# Altium PCB MainBoardPCB_4.PcbDoc (part 32 of 32)
Units mm, origin at the board's own origin, x right, y up, seen from the top; angles counter-clockwise.
Board outline 333.63 x 349.38 mm, 16 copper layers (L1, L2 (GND), L3 (Sign), L4 (GND), L5 (Sign), L6 (PWR/GND), L7(PWR/GND), L8 (Plane_GND), L9 (PWR/GND), L10 (PWR/GND), L11 (PWR/GND), L12 (Sign), L13 (GND), L14 (Sign), L15 (GND), L16), stack 2.502 mm thick; 2205 components, 1648 nets, 8314 pads, 3172 vias.
Unrouted connection lines stored in the file: 5141.
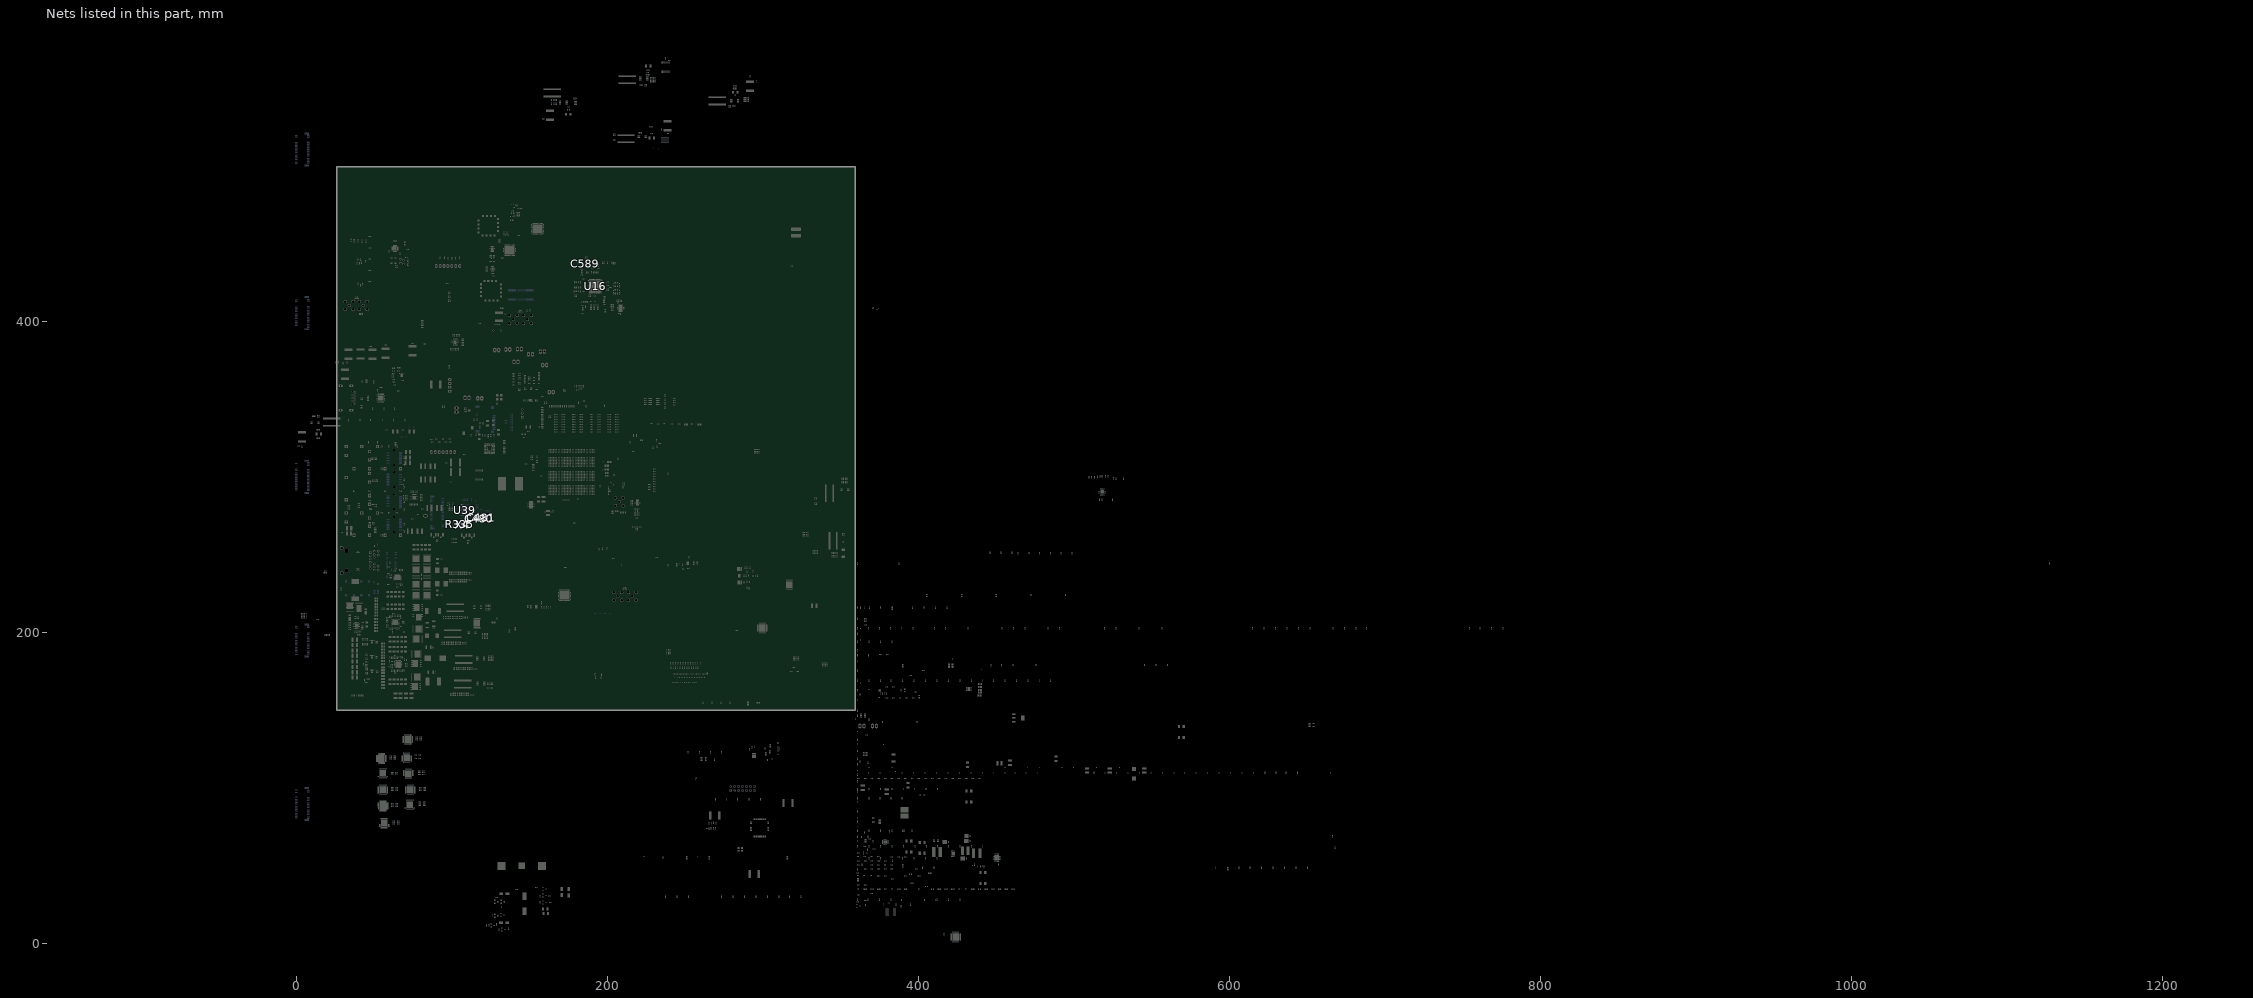
[diagram p32: the nets of this part, all layers, seen from the top]

## Via types
v1: diameter 0.5, hole 0.2, L1 to L16, tented both sides, 1153 vias
v2: diameter 0.5/0.35/0.35/0.35/0.35/0.35/0.35/0.35/0.35/0.35/0.35/0.35/0.35/0.35/0.35/0.5 (per signal layer), hole 0.2, L1 to L16, tented both sides, 548 vias
v3: diameter 0.5, hole 0.2, L1 to L16, 522 vias
v4: diameter 0.5/0.35/0.35/0.35/0.35/0.35/0.35/0.35/0.35/0.35/0.35/0.35/0.35/0.35/0.35/0.5 (per signal layer), hole 0.15, L1 to L16, tented both sides, 266 vias
v5: diameter 0.8, hole 0.4, L1 to L16, tented both sides, 164 vias
v6: diameter 0.35/0/0.35 (per signal layer), hole 0.127, L1 to L3 (Sign), tented both sides, 132 vias
v7: diameter 2.54, hole 1.02, L1 to L16, 125 vias
v8: diameter 1.4, hole 0.5, L1 to L16, tented both sides, 80 vias
v9: diameter 0.35, hole 0.127, L1 to L2 (GND), tented both sides, 36 vias
v10: diameter 0.4, hole 0.2, L1 to L16, 16 vias
v11: diameter 0.25, hole 0.2, L1 to L16, 16 vias
v12: diameter 5, hole 3, L1 to L16, 15 vias
v13: diameter 0.3, hole 0.2, L1 to L16, 15 vias
v14: diameter 0.45, hole 0.15, L1 to L16, 12 vias
v15: diameter 0.5/0.35/0.35/0.35/0.35/0.35/0.35/0.35/0.35/0.35/0.35/0.35/0.35/0.35/0.35/0.45 (per signal layer), hole 0.15, L1 to L16, tented both sides, 10 vias
v16: diameter 0.2/0/0.2 (per signal layer), hole 0.1, L1 to L3 (Sign), tented both sides, 9 vias
v17: diameter 0.4, hole 0.1, L1 to L16, 7 vias
v18: diameter 0.5, hole 0.2, L3 (Sign) to L6 (PWR/GND), tented both sides, 6 vias
v19: diameter 1.65, hole 1.65, L1 to L16, 6 vias
v20: diameter 1.15, hole 1.15, L1 to L16, 6 vias
v21: diameter 0.35/0/0.35 (per signal layer), hole 0.127, L14 (Sign) to L16, tented both sides, 5 vias
v22: diameter 0.2, hole 0.1, L1 to L16, 4 vias
v23: diameter 0.4, hole 0.2, L1 to L16, tented both sides, 2 vias
v24: diameter 0.4, hole 0.15, L1 to L16, 2 vias
v25: diameter 0.508, hole 0.127, L1 to L2 (GND), 2 vias
v26: diameter 0.508, hole 0.127, L2 (GND) to L3 (Sign), 2 vias
v27: diameter 0.5/0.35/0.35/0.35/0.35/0.35/0.35/0.35/0.35/0.35/0.35/0.35/0.35/0.35/0.35/0.5 (per signal layer), hole 0.15, L1 to L16, 2 vias
v28: diameter 0.35, hole 0.127, L3 (Sign) to L6 (PWR/GND), tented both sides, 2 vias
v29: diameter 5.5, hole 3.5, L1 to L16, 1 vias
v30: diameter 0.5/0.35/0.35/0.35/0.35/0.35/0.35/0.35/0.35/0.35/0.35/0.35/0.35/0.35/0.35/0.5 (per signal layer), hole 0.2, L1 to L16, 1 vias
v31: diameter 0.35/0.35/0.35 (per signal layer), hole 0.127, L1 to L3 (Sign), tented both sides, 1 vias
v32: diameter 0.45/0/0.45 (per signal layer), hole 0.15, L1 to L3 (Sign), tented both sides, 1 vias
v33: diameter 0.45/0/0.45 (per signal layer), hole 0.2, L14 (Sign) to L16, tented both sides, 1 vias
v34: diameter 0.35, hole 0.127, L2 (GND) to L3 (Sign), 1 vias
v35: diameter 0.35, hole 0.127, L1 to L2 (GND), 1 vias

## Nets (pads, with @x,y where several pads share a name; then routed paths per layer and width w, separated by ;. In a path a pad name is that pad's centre, name@x,y a point inside that pad or via, vN(x,y) a via of type N, cw(c..) or ccw(c..) an arc to the next point about the centre after c; other vN are vias at no path point) (continued)
X1: C481.2 R335.2 U39.14 X4.1
X2: C480.2 R335.1 U39.15 X4.3
XO_LMK05028_P: C589.2 U16.43
pads on no net: C558.4 D22.2 D28.1 J1_PCIE0. J1_PCIE0.56 J1_PCIE0.58 J1_PCIE1. J1_PCIE1.56 J1_PCIE1.58 J1_PCIE2. J1_PCIE2.56 J1_PCIE2.58 J1_PCIE3. J1_PCIE3.56 J1_PCIE3.58 J1_PCIE4. J1_PCIE4.56 J1_PCIE4.58 J14.3 J27. J27.5 J27.6 J27.7 J27.8 J27.11 J27.13 J27.17 J27.19 J27.20 J27.22 J27.23 J27.24 J27.25 J27.26 J27.28 J27.30 J27.32 J27.34 J27.36 J27.40 J27.42 J27.44 J27.46 J27.48 J27.56 J27.58 J27.59 J28.MH1 J28.MH2 J31. J31.1 J31.2 J31.3 J31.4 J31.5 J31.6 J31.7 J31.8 J31.9 J31.10 J31.11 J31.12 J31.13 J31.14 J31.15 J31.16 J31.17 J31.18 J31.19 J31.20 J31.21 J31.22 J31.23 J31.24 J31.25 J31.26 J31.27 J31.28 J31.29 J31.30 J31.31 J31.32 J31.33 J31.34 J31.35 J31.36 J31.37 J31.38 J31.39 J31.40 J31.41 J31.42 J31.43 J31.44 J31.45 J31.46 J31.47 J31.48 J31.49 J31.50 J31.51 J31.52 J31.53 J31.54 J31.55 J31.56 J31.57 J31.58 J31.59 J31.60 J31.61 J31.62 J31.63 J31.64 J31.65 J31.66 J31.67 J31.68 J31.69 J31.70 J31.71 J31.72 J31.73 J31.74 J31.75 J31.76 J31.77 J31.78 J31.79 J31.80 P12.11 R100.1 R100.2 R132.2 R133.2 R134.2 R135.2 R136.2 R137.2 R138.2 R141.2 R142.2 R145.2 R146.2 R147.2 R148.2 R151.2 R152.2 R455_1.1 R455_1.2 R456_1.1 R456_1.2 R458_1.1 R458_1.2 R460_1.1 R460_1.2 R462_1.1 R462_1.2 R464_1.1 R464_1.2 R475_1.1 R475_1.2 R476_1.1 R476_1.2 R477_1.1 R477_1.2 R478_1.1 R478_1.2 R479_1.1 R479_1.2 R480_1.1 R480_1.2 R492_1.1 R492_1.2 R493_1.1 R493_1.2 R494_1.1 R494_1.2 R495_1.1 R495_1.2 R496_1.1 R496_1.2 R497_1.1 R497_1.2 R500_1.1 R500_1.2 R501_1.1 R501_1.2 R502_1.1 R502_1.2 R503_1.1 R503_1.2 R504_1.1 R504_1.2 R505_1.1 R505_1.2 R508_1.1 R508_1.2 R509_1.1 R509_1.2 R510_1.1 R510_1.2 R511_1.1 R511_1.2 R512_1.1 R512_1.2 R513_1.1 R513_1.2 R516_1.1 R516_1.2 R517_1.1 R517_1.2 R518_1.1 R518_1.2 R519_1.1 R519_1.2 R520_1.1 R520_1.2 R521_1.1 R521_1.2 R654.1 R697_1.1 R697_1.2 R698_1.1 R698_1.2 R699_1.1 R699_1.2 R700_1.1 R700_1.2 R701_1.1 R701_1.2 R702_1.1 R702_1.2 R703_1.1 R703_1.2 R704_1.1 R704_1.2 R705_1.1 R705_1.2 R706_1.1 R706_1.2 R707_1.1 R707_1.2 R708_1.1 R708_1.2 R738_1.1 R738_1.2 R739_1.1 R739_1.2 R740_1.1 R740_1.2 R741_1.1 R741_1.2 R742_1.1 R742_1.2 R743_1.1 R743_1.2 R758_1.1 R758_1.2 R759_1.1 R759_1.2 R760_1.1 R760_1.2 R761_1.1 R761_1.2 R762_1.1 R762_1.2 R763_1.1 R763_1.2 R776.1 R777.1 T5. T6. T7. T8. T9. T10. T11. T12. T13. T14. T15. T16. T17. T18. T19. T20. T21.MH1 T21.MH2 T35. U1.A12 U1.A13 U1.A14 U1.A15 U1.A16 U1.A17 U1.A19 U1.AA8 U1.AA16 U1.AA17 U1.AA26 U1.AA30 U1.AB5 U1.AB6 U1.AB8 U1.AB16 U1.AB18 U1.AB19 U1.AB20 U1.AB21 U1.AB29 U1.AC7 U1.AC8 U1.AC13 U1.AC16 U1.AC17 U1.AC18 U1.AC19 U1.AD7 U1.AD16 U1.AD17 U1.AD19 U1.AE7 U1.AE10 U1.AE12 U1.AE17 U1.AE18 U1.AE19 U1.AF1 U1.AF2 U1.AF13 U1.AF15 U1.AF16 U1.AF17 U1.AF18 U1.AG3 U1.AG4 U1.AG5 U1.AG6 U1.AG8 U1.AG9 U1.AG14 U1.AG15 U1.AG16 U1.AG18 U1.AG19 U1.AH1 U1.AH2 U1.AH3 U1.AH4 U1.AH6 U1.AH7 U1.AH8 U1.AH14 U1.AH16 U1.AH17 U1.AH18 U1.AJ6 U1.AJ7 U1.AJ14 U1.AJ15 U1.AJ16 U1.AJ17 U1.AJ27 U1.AK12 U1.AK14 U1.AK15 U1.AK16 U1.AK17 U1.AK18 U1.B12 U1.B14 U1.B15 U1.B16 U1.B19 U1.C12 U1.C13 U1.C14 U1.C16 U1.C17 U1.D12 U1.D14 U1.D15 U1.D16 U1.D17 U1.E12 U1.E13 U1.E14 U1.E15 U1.E17 U1.F12 U1.F13 U1.F15 U1.F16 U1.G13 U1.G14 U1.G15 U1.G16 U1.H12 U1.H13 U1.H14 U1.H16 U1.J12 U1.J14 U1.J15 U1.J16 U1.K11 U1.K13 U1.K14 U1.K15 U1.L14 U1.L15 U1.L25 U1.L26 U1.W9 U1.W10 U1.W26 U1.W27 U1.Y9 U1.Y27 U1.Y29 U1.Y30 U4.11 U5.11 U8.T4 U9.T4 U10.T4 U11.T4 U12.12 U12.13 U12.15 U12.16 U12.18 U12.19 U12.21 U12.22 U12.24 U12.25 U12.27 U12.28 U12.50 U13.9 U13.10 U13.12 U13.13 U13.15 U13.16 U13.18 U13.19 U13.21 U13.22 U13.24 U13.25 U13.27 U13.28 U13.30 U13.31 U13.33 U13.34 U13.42 U13.43 U14.42 U14.43 U16.5 U16.6 U16.10 U16.11 U16.18 U18.A3 U26_SPI_bridge2.14 U28_SPI_bridge2.12 U28_SPI_bridge2.13 U28_SPI_bridge2.14 U30.6 U30.7 U30.8 U31.3 U31.4 U31.8 U31.13 U31.14 U31.15 U31.16 U32.8 U32.13 U32.14 U32.15 U32.16 U33.7 U35_I2C_Expander1.7 U35_I2C_Expander1.10 U35_I2C_Expander1_1.1 U35_I2C_Expander1_1.2 U35_I2C_Expander1_1.3 U35_I2C_Expander1_1.4 U35_I2C_Expander1_1.5 U35_I2C_Expander1_1.6 U35_I2C_Expander1_1.7 U35_I2C_Expander1_1.8 U35_I2C_Expander1_1.9 U35_I2C_Expander1_1.10 U35_I2C_Expander1_1.11 U35_I2C_Expander1_1.12 U35_I2C_Expander1_1.13 U35_I2C_Expander1_1.14 U35_I2C_Expander1_1.15 U35_I2C_Expander1_1.16 U35_I2C_Expander1_1.17 U35_I2C_Expander1_1.18 U35_I2C_Expander1_1.19 U35_I2C_Expander1_1.20 U35_I2C_Expander1_1.21 U35_I2C_Expander1_1.22 U35_I2C_Expander1_1.23 U35_I2C_Expander1_1.24 U35_I2C_Expander1_1.25 U35_I2C_Expander1_1.26 U35_I2C_Expander1_1.27 U35_I2C_Expander1_1.28 U35_I2C_Expander1_1.29 U35_I2C_Expander2.7 U35_I2C_Expander2.10 U35_I2C_Expander2_1.1 U35_I2C_Expander2_1.2 U35_I2C_Expander2_1.3 U35_I2C_Expander2_1.4 U35_I2C_Expander2_1.5 U35_I2C_Expander2_1.6 U35_I2C_Expander2_1.7 U35_I2C_Expander2_1.8 U35_I2C_Expander2_1.9 U35_I2C_Expander2_1.10 U35_I2C_Expander2_1.11 U35_I2C_Expander2_1.12 U35_I2C_Expander2_1.13 U35_I2C_Expander2_1.14 U35_I2C_Expander2_1.15 U35_I2C_Expander2_1.16 U35_I2C_Expander2_1.17 U35_I2C_Expander2_1.18 U35_I2C_Expander2_1.19 U35_I2C_Expander2_1.20 U35_I2C_Expander2_1.21 U35_I2C_Expander2_1.22 U35_I2C_Expander2_1.23 U35_I2C_Expander2_1.24 U35_I2C_Expander2_1.25 U35_I2C_Expander2_1.26 U35_I2C_Expander2_1.27 U35_I2C_Expander2_1.28 U35_I2C_Expander2_1.29 U35_I2C_Expander3.7 U35_I2C_Expander3.10 U35_I2C_Expander3_1.1 U35_I2C_Expander3_1.2 U35_I2C_Expander3_1.3 U35_I2C_Expander3_1.4 U35_I2C_Expander3_1.5 U35_I2C_Expander3_1.6 U35_I2C_Expander3_1.7 U35_I2C_Expander3_1.8 U35_I2C_Expander3_1.9 U35_I2C_Expander3_1.10 U35_I2C_Expander3_1.11 U35_I2C_Expander3_1.12 U35_I2C_Expander3_1.13 U35_I2C_Expander3_1.14 U35_I2C_Expander3_1.15 U35_I2C_Expander3_1.16 U35_I2C_Expander3_1.17 U35_I2C_Expander3_1.18 U35_I2C_Expander3_1.19 U35_I2C_Expander3_1.20 U35_I2C_Expander3_1.21 U35_I2C_Expander3_1.22 U35_I2C_Expander3_1.23 U35_I2C_Expander3_1.24 U35_I2C_Expander3_1.25 U35_I2C_Expander3_1.26 U35_I2C_Expander3_1.27 U35_I2C_Expander3_1.28 U35_I2C_Expander3_1.29 U35_I2C_Expander?.1 U35_I2C_Expander?.2 U35_I2C_Expander?.3 U35_I2C_Expander?.4 U35_I2C_Expander?.5 U35_I2C_Expander?.6 U35_I2C_Expander?.7 U35_I2C_Expander?.8 U35_I2C_Expander?.9 U35_I2C_Expander?.10 U35_I2C_Expander?.11 U35_I2C_Expander?.12 U35_I2C_Expander?.13 U35_I2C_Expander?.14 U35_I2C_Expander?.15 U35_I2C_Expander?.16 U35_I2C_Expander?.17 U35_I2C_Expander?.18 U35_I2C_Expander?.19 U35_I2C_Expander?.20 U35_I2C_Expander?.21 U35_I2C_Expander?.22 U35_I2C_Expander?.23 U35_I2C_Expander?.24 U35_I2C_Expander?.25 U35_I2C_Expander?.26 U35_I2C_Expander?.27 U35_I2C_Expander?.28 U35_I2C_Expander?.29 U35_I2C_Expander_10.1 U35_I2C_Expander_10.2 U35_I2C_Expander_10.3 U35_I2C_Expander_10.4 U35_I2C_Expander_10.5 U35_I2C_Expander_10.6 U35_I2C_Expander_10.7 U35_I2C_Expander_10.8 U35_I2C_Expander_10.9 U35_I2C_Expander_10.10 U35_I2C_Expander_10.11 U35_I2C_Expander_10.12 U35_I2C_Expander_10.13 U35_I2C_Expander_10.14 U35_I2C_Expander_10.15 U35_I2C_Expander_10.16 U35_I2C_Expander_10.17 U35_I2C_Expander_10.18 U35_I2C_Expander_10.19 U35_I2C_Expander_10.20 U35_I2C_Expander_10.21 U35_I2C_Expander_10.22 U35_I2C_Expander_10.23 U35_I2C_Expander_10.24 U35_I2C_Expander_10.25 U35_I2C_Expander_10.26 U35_I2C_Expander_10.27 U35_I2C_Expander_10.28 U35_I2C_Expander_10.29 U35_I2C_Expander_11.1 U35_I2C_Expander_11.2 U35_I2C_Expander_11.3 U35_I2C_Expander_11.4 U35_I2C_Expander_11.5 U35_I2C_Expander_11.6 U35_I2C_Expander_11.7 U35_I2C_Expander_11.8 U35_I2C_Expander_11.9 U35_I2C_Expander_11.10 U35_I2C_Expander_11.11 U35_I2C_Expander_11.12 U35_I2C_Expander_11.13 U35_I2C_Expander_11.14 U35_I2C_Expander_11.15 U35_I2C_Expander_11.16 U35_I2C_Expander_11.17 U35_I2C_Expander_11.18 U35_I2C_Expander_11.19 U35_I2C_Expander_11.20 U35_I2C_Expander_11.21 U35_I2C_Expander_11.22 U35_I2C_Expander_11.23 U35_I2C_Expander_11.24 U35_I2C_Expander_11.25 U35_I2C_Expander_11.26 U35_I2C_Expander_11.27 U35_I2C_Expander_11.28 U35_I2C_Expander_11.29 U35_I2C_Expander_12.1 U35_I2C_Expander_12.2 U35_I2C_Expander_12.3 U35_I2C_Expander_12.4 U35_I2C_Expander_12.5 U35_I2C_Expander_12.6 U35_I2C_Expander_12.7 U35_I2C_Expander_12.8 U35_I2C_Expander_12.9 U35_I2C_Expander_12.10 U35_I2C_Expander_12.11 U35_I2C_Expander_12.12 U35_I2C_Expander_12.13 U35_I2C_Expander_12.14 U35_I2C_Expander_12.15 U35_I2C_Expander_12.16 U35_I2C_Expander_12.17 U35_I2C_Expander_12.18 U35_I2C_Expander_12.19 U35_I2C_Expander_12.20 U35_I2C_Expander_12.21 U35_I2C_Expander_12.22 U35_I2C_Expander_12.23 U35_I2C_Expander_12.24 U35_I2C_Expander_12.25 U35_I2C_Expander_12.26 U35_I2C_Expander_12.27 U35_I2C_Expander_12.28 U35_I2C_Expander_12.29 U35_I2C_Expander_13.1 U35_I2C_Expander_13.2 U35_I2C_Expander_13.3 U35_I2C_Expander_13.4 U35_I2C_Expander_13.5 U35_I2C_Expander_13.6 U35_I2C_Expander_13.7 U35_I2C_Expander_13.8 U35_I2C_Expander_13.9 U35_I2C_Expander_13.10 U35_I2C_Expander_13.11 U35_I2C_Expander_13.12 U35_I2C_Expander_13.13 U35_I2C_Expander_13.14 U35_I2C_Expander_13.15 U35_I2C_Expander_13.16 U35_I2C_Expander_13.17 U35_I2C_Expander_13.18 U35_I2C_Expander_13.19 U35_I2C_Expander_13.20 U35_I2C_Expander_13.21 U35_I2C_Expander_13.22 U35_I2C_Expander_13.23 U35_I2C_Expander_13.24 U35_I2C_Expander_13.25 U35_I2C_Expander_13.26 U35_I2C_Expander_13.27 U35_I2C_Expander_13.28 U35_I2C_Expander_13.29 U35_I2C_Expander_14.1 U35_I2C_Expander_14.2 U35_I2C_Expander_14.3 U35_I2C_Expander_14.4 U35_I2C_Expander_14.5 U35_I2C_Expander_14.6 U35_I2C_Expander_14.7 U35_I2C_Expander_14.8 U35_I2C_Expander_14.9 U35_I2C_Expander_14.10 U35_I2C_Expander_14.11 U35_I2C_Expander_14.12 U35_I2C_Expander_14.13 U35_I2C_Expander_14.14 U35_I2C_Expander_14.15 U35_I2C_Expander_14.16 U35_I2C_Expander_14.17 U35_I2C_Expander_14.18 U35_I2C_Expander_14.19 U35_I2C_Expander_14.20 U35_I2C_Expander_14.21 U35_I2C_Expander_14.22 U35_I2C_Expander_14.23 U35_I2C_Expander_14.24 U35_I2C_Expander_14.25 U35_I2C_Expander_14.26 U35_I2C_Expander_14.27 U35_I2C_Expander_14.28 U35_I2C_Expander_14.29 U35_I2C_Expander_16.7 U35_I2C_Expander_16.10 U35_I2C_Expander_16_1.1 U35_I2C_Expander_16_1.2 U35_I2C_Expander_16_1.3 U35_I2C_Expander_16_1.4 U35_I2C_Expander_16_1.5 U35_I2C_Expander_16_1.6 U35_I2C_Expander_16_1.7 U35_I2C_Expander_16_1.8 U35_I2C_Expander_16_1.9 U35_I2C_Expander_16_1.10 U35_I2C_Expander_16_1.11 U35_I2C_Expander_16_1.12 U35_I2C_Expander_16_1.13 U35_I2C_Expander_16_1.14 U35_I2C_Expander_16_1.15 U35_I2C_Expander_16_1.16 U35_I2C_Expander_16_1.17 U35_I2C_Expander_16_1.18 U35_I2C_Expander_16_1.19 U35_I2C_Expander_16_1.20 U35_I2C_Expander_16_1.21 U35_I2C_Expander_16_1.22 U35_I2C_Expander_16_1.23 U35_I2C_Expander_16_1.24 U35_I2C_Expander_16_1.25 U35_I2C_Expander_16_1.26 U35_I2C_Expander_16_1.27 U35_I2C_Expander_16_1.28 U35_I2C_Expander_16_1.29 U39.18 U39.25 U39.26 U39.29 U39.32 U39.37 U39.38 U39.40 U40.6 U41.A1 U41.A2 U41.A7 U41.A8 U41.A9 U41.A10 U41.A11 U41.A12 U41.A13 U41.A14 U41.B1 U41.B7 U41.B8 U41.B9 U41.B10 U41.B11 U41.B12 U41.B13 U41.B14 U41.C1 U41.C3 U41.C5 U41.C7 U41.C8 U41.C9 U41.C10 U41.C11 U41.C12 U41.C13 U41.C14 U41.D1 U41.D2 U41.D3 U41.D4 U41.D12 U41.D13 U41.D14 U41.E1 U41.E2 U41.E3 U41.E5 U41.E8 U41.E9 U41.E10 U41.E12 U41.E13 U41.E14 U41.F1 U41.F2 U41.F3 U41.F10 U41.F12 U41.F13 U41.F14 U41.G1 U41.G2 U41.G3 U41.G10 U41.G12 U41.G13 U41.G14 U41.H1 U41.H2 U41.H3 U41.H5 U41.H12 U41.H13 U41.H14 U41.J1 U41.J2 U41.J3 U41.J12 U41.J13 U41.J14 U41.K1 U41.K2 U41.K3 U41.K6 U41.K7 U41.K10 U41.K12 U41.K13 U41.K14 U41.L1 U41.L2 U41.L3 U41.L12 U41.L13 U41.L14 U41.M1 U41.M2 U41.M3 U41.M7 U41.M8 U41.M9 U41.M10 U41.M11 U41.M12 U41.M13 U41.M14 U41.N1 U41.N3 U41.N6 U41.N7 U41.N8 U41.N9 U41.N10 U41.N11 U41.N12 U41.N13 U41.N14 U41.P1 U41.P2 U41.P7 U41.P8 U41.P9 U41.P10 U41.P11 U41.P12 U41.P13 U41.P14 U42.6 U44.8 U44.9 U45.12 U45.15 U45.16 U46.A3 U46.B3 U46.C4 U47.E2 U47.E4 U48.11 U55.22 U55.28 U55.29 U55.30 U55.32 U55.33 U55.34 U55.36 U55.43 U55.44 U55.45 U55.46 U55.53 U55.54 U55.55 U55.57 U55.58 U55.59 U55.60 U57.11 U57.12 U58.10 U58.11 U59_5V_to_3V3_for_FTDI.6 U59_U_5V_to_3V31.6 U59_U_5V_to_3V32.6 U59_U_5V_to_3V33.6 U60.8 U63.5 U65.1 U69.8 U73.3 U78.3 U78.4 U79.5 U79.6 U79.11 U79.12
copper on no net: | length 221
  L1 w0.116: 206.324,342.392 v4(206.728,342.796) ; 211.541,342.801 211.938,342.405 v6(211.938,342.402) ; 370.718,242.339 v6(371.408,242.339) ; 370.955,237.947 v2(371.442,238.434) ; 374.352,239.977 v2(374.839,240.464) ; 374.809,249.091 v3(375.296,249.579) ; 376.803,243.901 v6(377.29,244.389)
  L1 w0.254: 57.596,118.886 58.238,118.886 59.388,117.736 60.812,117.736 61.109,118.033 61.109,118.455 61.164,118.511 ; 57.596,119.536 57.601,119.542 v3(59.046,119.542) ; 57.596,120.186 57.971,120.186 59.171,121.386 60.754,121.386 61.168,120.973 61.168,120.592 ; 58.521,98.666 59.206,98.666 60.356,97.516 61.94,97.516 62.24,97.816 62.24,98.214 62.29,98.264 64.177,98.264 64.179,98.266 ; 58.521,99.316 v3(60.139,99.316) ; 58.521,99.966 59.156,99.966 60.356,101.166 61.94,101.166 62.29,100.816 62.29,100.364 64.177,100.364 64.179,100.366 ; 58.521,109.332 59.506,109.332 60.7,108.138 61.804,108.138 62.004,108.338 62.004,108.972 63.855,108.973 ; 58.521,109.982 58.523,109.979 v3(59.839,109.979) ; 58.521,110.632 59.504,110.632 60.754,111.882 61.613,111.882 62.004,111.49 62.004,111.006 63.855,111.006 ; 58.636,88.333 59.538,88.333 60.604,87.268 61.854,87.268 62.148,87.562 62.148,87.962 64.179,87.962 ; 58.636,88.983 v3(60.172,88.983) ; 58.636,89.633 59.404,89.633 60.604,90.833 61.891,90.833 62.148,90.577 62.148,90.027 64.179,90.027 ; 59.296,77.163 60.071,77.163 61.371,75.863 62.884,75.863 63.088,76.067 63.088,76.815 64.28,76.815 64.289,76.806 65.079,76.806 ; 59.296,77.813 59.305,77.822 v3(60.822,77.822) ; 59.296,78.463 60.026,78.463 61.226,79.663 62.884,79.663 63.09,79.457 63.09,78.813 64.28,78.813 64.289,78.803 65.079,78.803 ; 61.136,118.483 62.941,118.483 62.976,118.519 ; 61.168,119.548 61.169,119.549 v3(62.133,119.549) ; 61.168,120.6 62.98,120.6 ; 61.756,119.556 62.98,119.556 ; 62.004,109.979 v3(62.985,109.979) 63.855,109.979 ; 62.148,88.983 v3(63.185,88.983) 64.179,88.983 ; 62.29,99.316 62.323,99.283 v3(63.181,99.283) 63.199,99.301 64.162,99.301 64.179,99.319 ; 63.09,77.822 v3(64.167,77.822) 64.172,77.818 65.075,77.818 65.079,77.813 ; 73.817,119.263 74.722,119.263 75.872,118.113 76.981,118.113 77.254,118.386 77.254,118.89 78.973,118.89 ; 73.817,119.913 73.865,119.961 73.89,119.937 v3(75.319,119.937) ; 73.817,120.563 74.402,120.563 75.772,121.934 76.832,121.934 77.181,121.585 77.181,121.179 77.253,121.107 78.971,121.107 ; 74.603,131.106 75.507,131.106 76.35,130.264 77.64,130.264 77.831,130.455 77.831,130.791 79.644,130.791 ; 74.603,131.756 v3(75.8,131.756) ; 74.603,132.406 75.378,132.406 76.26,133.288 77.682,133.288 77.831,133.139 77.831,132.741 79.644,132.741 ; 74.915,109.182 76.205,109.182 77.505,107.882 79.043,107.882 79.393,108.232 79.393,108.682 81.208,108.682 ; 74.915,109.832 74.936,109.811 v3(76.981,109.811) ; 74.915,110.482 76.37,110.482 77.505,111.618 79.043,111.618 79.367,111.293 79.367,110.841 79.392,110.815 81.208,110.815 ; 75.88,89.078 76.655,89.078 78.061,87.672 79.461,87.672 79.713,87.924 79.713,88.634 79.716,88.637 80.956,88.637 80.959,88.64 81.709,88.64 ; 75.88,89.728 75.886,89.734 v3(77.505,89.734) ; 75.88,90.378 76.621,90.378 76.655,90.344 78.264,91.953 79.122,91.953 79.603,91.472 79.603,90.944 79.713,90.833 81.708,90.833 ; 76.167,98.666 77.218,98.666 78.412,97.472 80.004,97.472 80.154,97.622 80.154,98.272 82.247,98.272 ; 76.167,99.316 76.183,99.3 v3(77.955,99.3) ; 76.167,99.966 77.218,99.966 78.418,101.166 79.797,101.166 80.155,100.807 80.155,100.316 82.247,100.316 ; 77.253,120.002 v3(78.031,120.002) 78.971,120.002 ; 77.831,131.756 v3(78.733,131.756) 79.644,131.756 ; 79.392,109.79 79.413,109.811 v3(80.342,109.811) 80.352,109.801 81.198,109.801 81.208,109.79 ; v3@80.776,89.737 79.717,89.737 79.713,89.74 80.776,89.74 v3(80.778,89.739) ; v3@80.777,89.736 81.706,89.736 81.709,89.733 ; 82.247,99.316 82.245,99.314 81.356,99.314 v3(81.354,99.312) ; v3(81.354,99.312) 80.167,99.312 80.154,99.3 80.162,99.308 81.35,99.308 v3(81.354,99.312)
  L1 w0.5: v1(42.597,17.328) 42.597,18.415 ; v1(42.597,20.128) 42.597,21.215 ; 43.145,18.415 v1(43.145,19.502) ; 43.145,21.215 v1(43.145,22.302) ; v1(43.694,17.328) 43.694,18.415 ; v1(43.694,20.128) 43.694,21.215 ; 44.25,18.415 v1(44.25,19.502) ; 44.25,21.215 v1(44.25,22.302) ; v1(44.799,17.328) 44.799,18.415 ; v1(44.799,20.128) 44.799,21.215
  L5 (Sign) w0.116: v28(371.685,243.799) v28(372.706,242.779)
  L3 (Sign) w0.092: 212.405,343.017 v18(212.801,342.621)
  L14 (Sign) w0.254: v3(59.046,119.542) 62.127,119.542 v3(62.133,119.549) ; v3(59.839,109.979) v3(62.985,109.979) ; v3(60.139,99.316) 60.172,99.283 v3(63.181,99.283) ; v3(60.172,88.983) v3(63.185,88.983) ; v3(60.822,77.822) v3(64.167,77.822) ; v3(75.319,119.937) 77.228,119.937 77.253,119.961 ; v3(75.8,131.756) v3(78.733,131.756) ; v3(76.981,109.811) v3(80.342,109.811) ; 77.236,120.002 v3(78.031,120.002) ; v3(77.505,89.734) 80.774,89.734 v3(80.778,89.739) ; v3(77.955,99.3) 77.967,99.312 v3(81.354,99.312)
  other v3: 54.771,75.513 55.871,75.513 56.971,75.513 58.071,75.513 54.771,76.613 55.871,76.613 56.971,76.613 58.071,76.613 54.771,77.713 55.871,77.713 56.971,77.713 58.071,77.713 54.771,78.813 55.871,78.813 56.971,78.813 58.071,78.813 54.111,86.683 55.211,86.683 56.311,86.683 57.411,86.683 71.355,87.428 72.455,87.428 73.555,87.428 74.655,87.428 54.111,87.783 55.211,87.783 56.311,87.783 57.411,87.783 71.355,88.528 72.455,88.528 73.555,88.528 74.655,88.528 54.111,88.883 55.211,88.883 56.311,88.883 57.411,88.883 71.355,89.628 72.455,89.628 73.555,89.628 74.655,89.628 54.111,89.983 55.211,89.983 56.311,89.983 57.411,89.983 71.355,90.728 72.455,90.728 73.555,90.728 74.655,90.728 53.996,97.016 55.096,97.016 56.196,97.016 57.296,97.016 71.642,97.016 72.742,97.016 73.842,97.016 74.942,97.016 53.996,98.116 55.096,98.116 56.196,98.116 57.296,98.116 71.642,98.116 72.742,98.116 73.842,98.116 74.942,98.116 53.996,99.216 55.096,99.216 56.196,99.216 57.296,99.216 71.642,99.216 72.742,99.216 73.842,99.216 74.942,99.216 53.996,100.316 55.096,100.316 56.196,100.316 57.296,100.316 71.642,100.316 72.742,100.316 73.842,100.316 74.942,100.316 70.39,107.532 71.49,107.532 72.59,107.532 73.69,107.532 53.996,107.682 55.096,107.682 56.196,107.682 57.296,107.682 70.39,108.632 71.49,108.632 72.59,108.632 73.69,108.632 53.996,108.782 55.096,108.782 56.196,108.782 57.296,108.782 70.39,109.732 71.49,109.732 72.59,109.732 73.69,109.732 53.996,109.882 55.096,109.882 56.196,109.882 57.296,109.882 70.39,110.832 71.49,110.832 72.59,110.832 73.69,110.832 53.996,110.982 55.096,110.982 56.196,110.982 57.296,110.982 53.071,117.236 54.171,117.236 55.271,117.236 56.371,117.236 69.292,117.613 70.392,117.613 71.492,117.613 72.592,117.613 53.071,118.336 54.171,118.336 55.271,118.336 56.371,118.336 69.292,118.713 70.392,118.713 71.492,118.713 72.592,118.713 53.071,119.436 54.171,119.436 55.271,119.436 56.371,119.436 69.292,119.813 70.392,119.813 71.492,119.813 72.592,119.813 53.071,120.536 54.171,120.536 55.271,120.536 56.371,120.536 69.292,120.913 70.392,120.913 71.492,120.913 72.592,120.913 70.078,129.456 71.178,129.456 72.278,129.456 73.378,129.456 70.078,130.556 71.178,130.556 72.278,130.556 73.378,130.556 70.078,131.656 71.178,131.656 72.278,131.656 73.378,131.656 70.078,132.756 71.178,132.756 72.278,132.756 73.378,132.756
  other v4: 195.377,344.081
  other v7: 365.925,19.431 402.272,19.914 371.297,22.606 370.802,28.854 377.863,29.273 385.229,29.273 392.595,29.273 399.961,29.273 414.693,29.273 421.615,29.273 428.981,29.273 436.347,29.273 443.713,29.273 451.066,29.273 458.432,29.273 465.798,29.273 473.164,29.273 480.085,29.273 487.451,29.273 494.817,29.273 502.183,29.273 509.549,29.273 516.915,29.273 524.281,29.273 531.635,29.273 539.001,29.273 408.648,29.489 465.798,37.998 473.164,37.998 379.324,59.372 387.007,64.668 441.947,64.834 556.387,73.393 580.504,73.393 604.888,73.393 627.99,73.393 651.104,73.393 674.205,73.393 697.319,73.393 720.42,73.393 743.534,73.393 766.635,73.393 362.636,74.905 560.438,83.629 585.076,83.629 609.956,83.629 633.578,83.629 657.187,83.629 680.809,83.629 704.418,83.629 728.04,83.629 751.662,83.629 775.271,83.629 417.716,94.221 387.769,95.377 521.818,103.632 438.048,104.102 463.182,104.102 488.328,104.102 513.207,104.102 500.431,105.664 506.4,116.599 396.733,117.5 363.131,151.397 370.497,151.397 392.608,192.621 399.974,192.621 407.34,192.621 414.706,192.621 422.059,192.621 429.425,192.621 436.791,192.621 405.308,201.346 427.152,201.346 441.452,201.346 448.818,201.346 478.282,201.346 536.715,201.346 551.447,201.346 609.879,201.346 661.441,201.346 362.636,232.181 387.007,232.181 766.166,242.418 792.582,242.418 818.985,242.418 845.401,242.418 871.804,242.418 898.22,242.418 923.353,242.418 949.769,242.418 976.173,242.418 1002.322,242.418 1028.738,242.418 1053.871,242.418 1079.017,242.418 1104.151,242.418 1155.967,242.418 1181.1,242.418 1206.233,242.418 1231.379,242.418 362.636,351.409 387.261,351.409 411.899,351.409 436.524,351.409 362.636,361.645 387.769,361.645 412.915,361.645 362.636,371.881 240.182,388.887 235.217,390.855 240.805,395.199 258.966,398.031 247.282,398.082 231.61,398.196 253.441,398.64 239.789,400.736 231.318,402.933 254.734,404 247.688,404.228 231.546,408.013 238.938,408.292 262.179,409.651 250.114,409.873 256.083,410.096
  other v31: 375.296,249.579

## Polygon pours and split planes (outlines as drawn)
CSP on L1 "L1-CSP" (solid, pour order 279): 35.344,235.28 43.258,235.28 45.949,232.589 45.949,230.226 44.005,228.282 36.106,228.282 34.023,230.365 34.023,234.036 35.242,235.255
no net on L1 "L1-No Net" (solid, pour order 269): 91.618,222.154
12V_HiSpeed on L1 "L1-3V3_RAIL" (solid, pour order 267): 101.724,216.814 108.378,216.814 108.938,217.374 108.938,219.836 107.743,221.031 96.275,221.031 94.866,219.621 94.866,217.233 95.272,216.827 101.787,216.827
5V_RAIL on L1 "L1-3V3_RAIL" (solid, pour order 263): 100.266,199.987 106.921,199.987 107.481,200.546 107.481,203.009 106.286,204.203 94.818,204.203 93.408,202.794 93.408,200.406 93.815,200 100.33,200
RAM_Vcc1V2 on L1 "L1-3V3_RAIL" (solid, pour order 261): 106.536,167.665 113.19,167.665 113.75,168.225 113.75,170.687 112.555,171.882 101.087,171.882 99.678,170.472 99.678,168.084 100.084,167.678 106.599,167.678
3V3_RAIL on L1 "L1-3V3_RAIL" (solid, pour order 251): 107.391,183.528 114.046,183.528 114.605,184.087 114.605,186.55 113.411,187.744 101.943,187.744 100.533,186.334 100.533,183.947 100.94,183.54 107.455,183.54
Vout_5V@10A_INA on L1 "L1-Vout_5V@10A_INA" (solid, pour order 249): 92.405,200.584 94.297,198.691 107.455,198.691 110.045,196.101 110.045,193.205 109.828,192.987 89.918,192.987 87.816,195.089 87.816,199.136 89.264,200.584
Vout2_1 on L1 "L1-Vout2_1" (solid, pour order 247): 91.63,172.441 93.398,172.441 100.103,165.735 113.817,165.735 115.595,163.957 115.595,160.909 114.91,160.223 114.91,160.147 114.14,160.147 93.738,160.146 89.599,164.285 89.599,171.501 90.538,172.441
Vout1_1 on L1 "L1-Vout1_1" (solid, pour order 243): 96.208,186.85 101.498,181.559 113.602,181.559 114.579,180.581 114.579,179.317 116.187,179.317 117.615,177.889 117.615,176.949 117.516,176.851 93.685,176.851 90.081,180.454 90.081,185.039 91.892,186.85
Vout1_2 on L1 "L1-Vout1_2" (solid, pour order 239): 92.926,217.589 95.618,214.897 108.372,214.897 111.443,211.826 111.443,210.338 110.605,209.5 92.239,209.5 88.816,212.924 88.816,216.209 90.195,217.589
PWR_OUT_20V on L1 "L1-PWR_OUT_20V" (solid, pour order 235): 48.822,193.927 48.683,193.788 48.683,190.731 49.716,189.698 50.563,189.698 50.931,190.066 50.931,192.373 49.378,193.926 48.835,193.926
PWR_OUT_20V on L1 "L1-PWR_OUT_20V 1" (solid, pour order 233): 48.822,194.039 48.683,194.179 48.683,197.235 49.716,198.269 50.563,198.269 50.931,197.901 50.931,195.593 49.378,194.041 48.835,194.041
Vout_2_Selector on L1 "L1-Vout_2_Selector" (solid, pour order 231): 48.532,193.927 48.671,193.788 48.671,190.731 47.638,189.698 46.792,189.698 46.424,190.066 46.424,192.373 47.976,193.926 48.519,193.926
Battery_PWR on L1 "L1-Battery_PWR" (solid, pour order 229): 48.532,194.039 48.671,194.179 48.671,197.235 47.638,198.269 46.792,198.269 46.424,197.901 46.424,195.593 47.976,194.041 48.519,194.041
Power2_In_CM on L1 "L1-Power2_In_CM" (solid, pour order 227): 45.733,178.917 45.472,179.178 45.202,179.178 45.075,179.051 45.075,177.137 45.288,176.924 45.288,176.32 45.473,176.136 46.943,176.136 47.123,175.943 48.009,175.057 48.552,175.057 48.565,175.056 48.704,175.195 48.704,178.252 47.671,179.285 46.825,179.285 46.456,178.917
Power1_In_CM on L1 "L1-Power1_In_CM" (solid, pour order 225): 46.038,172.167 45.337,172.868 45.337,173.437 45.739,173.839 46.878,173.839 46.892,173.825 48.009,174.942 48.552,174.942 48.565,174.943 48.704,174.804 48.704,171.747 48.636,171.679 48.636,170.464 47.561,169.389 45.822,169.389 45.809,169.402 45.809,169.788 46.038,170.017
Vout_1_Selector on L1 "L1-Vout_1_Selector" (solid, pour order 223): 48.855,175.056 48.716,175.195 48.716,178.252 49.749,179.285 50.595,179.285 50.964,178.917 50.964,176.61 49.411,175.057 48.868,175.057
Vout_1_Selector on L1 "L1-Vout_1_Selector 1" (solid, pour order 221): 48.855,174.943 48.716,174.804 48.716,171.747 49.749,170.714 50.595,170.714 50.964,171.082 50.964,173.389 49.411,174.942 48.868,174.942
Vout_2_Selector on L1 "L1-Vout_2_Selector 1" (solid, pour order 219): 48.855,184.265 48.716,184.126 48.716,181.069 49.749,180.036 50.595,180.036 50.964,180.404 50.964,182.711 49.411,184.264 48.868,184.264
Vout_2_Selector on L1 "L1-Vout_2_Selector 2" (solid, pour order 217): 48.855,184.378 48.716,184.517 48.716,187.574 49.749,188.607 50.595,188.607 50.964,188.239 50.964,185.932 49.411,184.379 48.868,184.379
Vout_1_Selector on L1 "L1-Vout_1_Selector 2" (solid, pour order 215): 48.565,184.265 48.704,184.126 48.704,181.069 47.671,180.036 46.825,180.036 46.456,180.404 46.456,182.711 48.009,184.264 48.552,184.264
CSN on L1 "L1-CSN" (solid, pour order 213): 48.565,184.378 48.704,184.517 48.704,187.574 47.671,188.607 46.825,188.607 46.456,188.239 46.456,185.932 48.009,184.379 48.552,184.379
NetC693_1 on L1 "L1-NetC693_1" (solid, pour order 203): 35.331,225.234 31.229,221.132 31.229,215.252 32.029,214.452 37.211,214.452 38.544,215.786 38.544,217.276 38.909,217.64 42.862,217.64 42.862,223.444 41.072,225.234
SW2_1 on L1 "L1-SW2_1" (solid, pour order 199): 81.298,174.135 83.515,176.352 85.649,176.352 86.39,175.611 86.39,173.63 88.405,171.615 88.405,163.639 85.458,160.693 80.519,160.693 80.519,160.705 78.842,162.382 78.842,167.589 78.308,168.123 75.806,168.123 74.924,169.005 74.924,173.647 75.412,174.135
SW1_1 on L1 "L1-SW1_1" (solid, pour order 195): 78.661,189.37 81.455,192.164 84.112,192.164 85.052,191.224 85.052,188.316 88.405,184.963 88.405,178.905 86.398,176.898 83.145,176.898 79.629,176.898 78.943,177.584 78.943,182.601 78.715,182.829 76.057,182.829 75.311,183.576 75.311,188.341 76.34,189.37
SW2_2 on L1 "L1-SW2_2" (solid, pour order 193): 76.53,204.802 84.863,204.802 86.716,202.949 86.716,194.412 85.407,193.103 80.099,193.103 79.642,193.561 79.642,198.171 79.21,198.603 77.127,198.603 76.086,199.644 76.086,204.357
SW1_2 on L1 "L1-SW1_2" (solid, pour order 191): 81.128,218.415 79.616,216.903 79.616,213.618 79.237,213.239 77.361,213.239 76.276,212.153 76.276,206.375 76.556,206.096 81.946,206.096 82.628,206.778 82.628,208.421 83.041,208.833 84.861,208.833 86.271,207.424 86.271,206.605 86.915,205.962 90.794,205.962 91.421,206.589 91.421,209.055 89.935,210.541 89.027,210.541 87.516,212.052 87.516,217.018 86.119,218.415
SW2 on L1 "SW2_L01_P165" (solid, pour order 165): 88.786,226.099 75.077,226.099 73.698,227.457 73.698,233.323 93.442,233.323 93.442,226.099
SW1 on L1 "SW1_L01_P163" (solid, remove dead copper, pour order 163): 88.328,245.2 74.78,245.2 73.662,244.056 73.662,237.96 93.442,237.96 93.442,245.2
no net on L1 "L1-No Net" (solid, pour order 159): 92.507,97.142
0.85V@40A_INA on L1 "0.85V@40A_INA_L01_P150" (solid, pour order 150): 93.832,226.109 93.832,233.306 97.534,233.306 97.862,232.978 113.243,232.978 113.243,238.214 97.767,238.214 97.5,237.947 93.832,237.947 93.832,245.2 117.137,245.2 117.137,226.109
eMMC_GND on L1 "L1-eMMC_GND" (solid, pour order 147): 112.801,233.236 112.8,233.237 98.128,233.237 97.698,233.667 97.684,233.654 73.698,233.654 73.698,237.566 73.711,237.579 97.621,237.579 98.031,237.989 98.032,237.989 112.877,237.989 112.878,237.989 112.878,233.234
0.85V@40A_INA on L1 "0.85V@40A_INA_L01_P113" (solid, pour order 113): 130.202,304.332 127.457,301.587 127.457,290.055 130.149,287.363 137.2,287.363 137.746,287.91 137.735,287.92 137.735,303.785 137.189,304.332
US+_Vcc_PS_IntFp on L1 "US+_VCC_PS_INTFP_L01_P099" (solid, pour order 99): 145.706,304.356 148.104,301.958 148.104,289.481 146.012,287.388 138.648,287.388 138.102,287.934 138.112,287.945 138.112,303.81 138.659,304.356
AGND_2 on L1 "AGND_2_L01_P134" (solid, remove dead copper, pour order 134): 58.433,213.225 68.437,213.225 68.437,199.489 59.212,199.489 56.667,202.034 56.667,211.46
eMMC_GND on L7(PWR/GND) "EMMC_GND_L07_P259" (solid, pour order 259): 25.865,150.02 359.494,150.02 359.494,499.397 25.865,499.397
US+_Vcc_PS_IntFp on L7(PWR/GND) "US+_VCC_PS_INTFP_L07_P100" (solid, pour order 100): 183.397,310.539 184.397,309.539 184.397,295.539 176.309,287.452 153.022,287.452 138.532,287.452 138.102,287.881 138.102,305.501 143.141,310.539
3V3_RAIL on L7(PWR/GND) "L7(PWR/GND)-3V3_RAIL" (solid, pour order 255): 112.573,190.82 111.872,190.119 102.243,190.119 99.2,187.076 99.2,183.629 100.419,182.41 114.783,182.41 115.557,181.635 115.557,163.36 119.215,159.702 127.203,159.702 139.268,171.767 139.268,196.139 164.376,221.247 222.872,221.247 272.682,271.056 290.906,271.056 306.794,286.944 306.794,350.291 314.642,358.14 314.642,390.233 302.438,402.438 169.887,402.438 160.692,411.632 53.708,411.632 30.81,388.734 30.81,368.173 63.41,335.573 134.278,335.573 154.508,355.803 205.664,355.803 224.879,336.588 224.879,298.629 207.669,281.419 186.436,281.419 124.422,219.405 117.399,219.354 96.353,219.354 84.569,231.138 84.569,244.284 90.322,250.038 112.674,250.038 114.579,251.943 114.529,251.993 114.529,311.302 105.156,320.675 87.287,320.675 81.534,326.428 38.5,326.428 32.118,320.046 32.118,199.146 38.91,192.354 38.91,168.532 42.951,164.49 71.285,164.49 73.33,166.535 73.33,180.226 87.744,194.64 111.364,194.64 112.573,193.432
Vout_1_Selector on L7(PWR/GND) "VOUT_1_SELECTOR_L07_P114" (solid, pour order 114): 48.71,171.566 49.56,170.714 50.782,170.714 51.219,171.151 51.219,179.279 48.872,181.626 48.872,183.189 48.133,183.928 48.369,184.163 48.797,184.163 48.581,184.379 47.911,184.379 45.775,182.242 45.775,180.368 48.71,177.432
SW2 on L7(PWR/GND) "SW2_L07_P135" (solid, pour order 135): 88.786,226.099 75.077,226.099 73.698,227.457 73.698,233.323 93.442,233.323 93.442,226.099
SW1 on L7(PWR/GND) "SW1_L07_P139" (solid, remove dead copper, pour order 139): 88.328,245.2 74.78,245.2 73.662,244.056 73.662,237.96 93.442,237.96 93.442,245.2
0.85V@40A_INA on L7(PWR/GND) "0.85V@40A_INA_L07_P148" (solid, pour order 148): 98.514,243.599 121.488,243.599 125.463,247.574 125.463,300.596 129.984,305.118 136.742,305.118 137.719,304.141 137.719,287.35 142.303,282.765 142.303,232.004 137.132,226.832 98.615,226.832 97.942,227.506 97.942,243.027
eMMC_GND on L8 (Plane_GND) "EMMC_GND_L08_P273" (solid, pour order 273): 25.87,150.012 359.499,150.012 359.499,499.389 25.87,499.389
US+_Vcc_PS_IntFp on L8 (Plane_GND) "US+_VCC_PS_INTFP_L08_P098" (solid, pour order 98): 184.397,309.539 184.397,295.539 176.309,287.452 153.022,287.452 138.532,287.452 138.102,287.881 138.102,305.501 142.141,309.539
5V_RAIL on L8 (Plane_GND) "L8 (Plane_GND)-No Net" (solid, pour order 265): 106.762,206.926 93.345,206.926 91.326,204.907 91.326,200.932 93.421,198.836 118.986,198.836 145.39,172.433 210.274,172.433 236.918,199.078 236.918,225.405 234.721,225.405 216.332,243.794 160.071,243.794 131.305,215.029 114.859,215.029 106.769,206.939
0V9@1A_REG3 on L8 (Plane_GND) "L8 (Plane_GND)-0V9@1A_REG3" (solid, pour order 97): 150.203,285.681 152.641,283.243 152.641,280.772 153.492,279.921 154.788,279.921 155.613,280.746 155.613,285.064 153.282,287.395 150.54,287.395 150.203,287.058
0.85V@40A_INA on L8 (Plane_GND) "0.85V@40A_INA_L08_P104" (solid, pour order 104): 98.514,243.599 121.488,243.599 125.463,247.574 125.463,300.596 129.984,305.118 136.742,305.118 137.719,304.141 137.719,287.35 142.303,282.765 142.303,232.004 137.132,226.832 98.615,226.832 97.942,227.506 97.942,243.027
eMMC_GND on L6 (PWR/GND) "EMMC_GND_L06_P277" (solid, remove dead copper, pour order 277): 25.87,150.012 359.499,150.012 359.499,499.389 25.87,499.389
US+_Vcc_PS_DDR_504 on L6 (PWR/GND) "US+_VCC_PS_DDR_504_L06_P106" (solid, pour order 106): 181.397,311.539 181.397,314.539 182.909,316.052 185.433,316.052 185.737,315.845 190.59,315.845 192.492,313.944 193.822,313.944 195.929,311.837 195.929,310.267 195.184,309.522 193.352,309.522 191.076,311.798 185.229,311.798 184.459,311.027 181.884,311.027 181.884,311.052
CSP on L6 (PWR/GND) "L6 (PWR/GND)-CSP" (solid, pour order 275): 36.83,235.496 43.193,235.496 49.835,228.854 49.835,202.349 49.136,201.651 44.228,201.651 42.634,203.245 42.634,224.104 35.573,231.166 35.573,234.239
RAM_Vcc1V2 on L9 (PWR/GND) "L9 (PWR/GND)-RAM_Vcc1V2" (solid, pour order 281): 168.383,287.344 168.383,290.919 169.004,291.539 176.973,291.539 179.214,293.781 179.214,303.068 177.965,304.317 177.965,308.994 177.905,309.054 176.912,309.054 175.397,307.539 175.397,295.539 174.397,294.539 167.397,294.539 165.95,295.986 161.915,295.986 161.468,295.539 161.62,295.387 161.662,288.579 160.426,287.344 160.426,228.549 122.517,190.64 122.517,178.689 119.875,176.048 102.984,176.048 97.701,170.764 97.701,167.411 99.936,165.176 131.623,165.176 180.442,213.995 180.442,245.478 202.594,267.631 202.594,278.057 216.421,291.884 216.421,340.462 210.642,346.24 160.845,346.24 153.314,338.709 153.314,328.981 160.426,321.869 188.337,321.869 193.314,316.892 193.256,316.834 193.256,284.607 178.613,269.964 168.432,269.964 167.246,271.488 167.246,277.553 168.453,278.76 168.453,287.274
FPGA_Vcc_HD on L9 (PWR/GND) "FPGA_VCC_HD_L09_P103" (solid, pour order 103): 172.397,315.539 173.397,314.539 173.397,313.539 172.397,312.539 172.397,311.539 170.397,311.539 169.397,310.539 169.397,304.539 170.397,303.539 170.397,297.539 169.911,297.053 164.883,297.053 163.397,298.539 159.207,298.539 158.919,298.828 158.919,302.717 159.741,303.539 164.397,303.539 166.397,305.539 166.397,312.539 169.397,315.539
Vout_2_Selector on L9 (PWR/GND) "L9 (PWR/GND)-Vout_2_Selector" (solid, pour order 237): 48.73,184.339 48.729,180.589 49.654,179.663 50.529,179.663 51.194,180.328 51.194,188.436 48.98,190.649 48.98,193.68 48.677,193.983 47.99,193.983 46.284,192.277 46.284,189.77 48.73,187.325
PWR_OUT_20V on L9 (PWR/GND) "PWR_OUT_20V_L09_P167" (solid, pour order 167): 79.121,258.534 86.487,258.534 88.341,256.68 88.341,156.502 55.689,156.502 55.689,240.974 74.155,258.534
no net on L9 (PWR/GND) "NONET_L09_P145" (solid, pour order 145): 60.856,45.86
eMMC_GND on L10 (PWR/GND) "EMMC_GND_L10_P109" (solid, remove dead copper, pour order 109): 25.87,150.012 359.499,150.012 359.499,499.389 25.87,499.389
0V9@1A_REG3 on L10 (PWR/GND) "L10 (PWR/GND)-No Net" (solid, pour order 107): 158.064,296.05 156.223,294.208 156.223,289.56 152.133,285.471 151.257,285.471 150.431,286.296 150.431,287.376 153.302,290.246 153.302,294.754 156.718,298.171 158.077,298.171 167.653,298.171 169.901,295.923 171.839,295.923 172.093,296.177 175.76,296.177 176.397,295.539 176.397,294.539 165.397,294.539 163.887,296.05
FPGA_Vcc_HD on L10 (PWR/GND) "FPGA_VCC_HD_L10_P108" (solid, pour order 108): 186.023,304.851 188.62,304.851 189.154,304.317 189.154,298.782 189.686,298.25 189.686,295.829 188.747,294.89 188.747,293.357 185.572,290.182 182.27,290.182 182.067,290.385 182.067,291.808 184.01,293.751 184.01,302.838
3.3V_PS_Config on L10 (PWR/GND) "3.3V_PS_CONFIG_L10_P102" (solid, pour order 102): 165.557,315.862 166.637,314.782 166.637,309.004 167.615,308.026 174.91,308.026 175.793,307.143 175.793,305.13 165.037,305.13 162.826,307.341 156.743,307.341 156.743,312.423 160.391,312.423 163.83,315.862
1V8@0.5A_ADC_filtered on L10 (PWR/GND) "1V8@0.5A_ADC_FILTERED_L10_P101" (solid, pour order 101): 170.129,298.272 170.129,297.437 171.027,296.539 175.855,296.539 176.847,295.546 176.847,288.442 174.282,285.877 154.432,285.877 152.514,283.959 152.514,282.283 152.921,281.876 169.202,281.876 193.18,281.876 203.429,292.125 203.429,311.147 202.308,312.268 199.887,312.268 198.73,311.11 198.73,294.792 191.071,287.134 181.576,287.134 179.921,288.789 179.921,296.215 182.397,298.691 182.397,300.539 182.397,307.048 179.393,310.052 177.324,310.052 176.987,309.715 176.987,309.172 180.397,305.763 180.397,301.644 177.749,298.996 170.854,298.996
no net on L2 (GND) "NONET_L02_P136" (solid, remove dead copper, pour order 136): 216.165,276.488 216.165,286.209 231.974,286.209 231.974,276.984 230.962,275.972 216.681,275.972
no net on L2 (GND) "NONET_L02_P115" (solid, remove dead copper, pour order 115): 174.608,280.136 174.555,280.189 174.555,291.295 189.304,291.295 189.307,291.298 189.307,280.136
eMMC_GND on L16 "L16-No Net" (solid, pour order 149): 112.814,233.236 112.813,233.237 98.141,233.237 97.71,233.667 97.696,233.654 73.71,233.654 73.71,237.566 73.723,237.579 97.634,237.579 98.044,237.989 112.89,237.989 112.89,233.234
V_PoE+ on L14 (Sign) "L14 (Sign)-V_PoE+" (solid, pour order 207): 49.6,234.95 55.334,229.216 55.334,219.532 47.324,211.522 31.861,211.522 26.619,216.764 26.619,233.705 27.864,234.95
CSN on L12 (Sign) "L12 (Sign)-CSN" (solid, pour order 211): 41.567,193.065 47.899,186.734 51.083,186.734 51.349,187 51.349,190.07 46.736,194.683 46.736,207.893 46.336,208.293 44.302,208.293 41.567,205.557
eMMC_GND on L13 (GND) "EMMC_GND_L13_P110" (solid, pour order 110): 25.87,150.012 359.499,150.012 359.499,499.389 25.87,499.389
eMMC_GND on L4 (GND) "EMMC_GND_L04_P111" (solid, pour order 111): 25.87,150.012 359.499,150.012 359.499,499.389 25.87,499.389
eMMC_GND on L15 (GND) "EMMC_GND_L15_P112" (solid, pour order 112): 25.87,150.012 359.499,150.012 359.499,499.389 25.87,499.389
RAM_DDR4_VTT on L5 (Sign) "L5 (Sign)-RAM_DDR4_VTT" (solid, pour order 283): 150.244,350.898 150.425,351.079 157.856,351.079 159.956,348.979 179.167,348.979 180.048,348.098 180.048,346.265 179.199,345.417 159.258,345.417 158.737,344.896 158.737,333.997 157.204,332.464 155.766,332.464 154.407,333.823 154.407,345.503 152.552,347.358 150.832,347.358 150.244,347.945

## Silkscreen, mask and mechanical layers (free items; w line width, h text height)
Top Overlay:
  text "0.85V 40A" at 102.387,243.332 h2
  text "12V 8A" at 106.648,211.722 h2
  text "5V 10A" at 104.902,195.707 h2

## Text inside footprints (layer, text, board x,y; h text height)
BT1: Mechanical 2 "open landscape for no solder resist" at 135.309,46.086 h0.81
C537: Bottom Overlay "1" at 37.32,355.298 h0.8 r270; Bottom Overlay "9" at 35.72,355.698 h0.8 r270; Mechanical 1 "Milling Area" at 28.52,347.098 h1.52 r270
P12: Top Overlay "2" at 276.301,100.393 h1.27; Top Overlay "1" at 276.301,97.853 h1.27; Top Overlay "14" at 296.621,100.393 h1.27; Top Overlay "13" at 296.621,97.853 h1.27